# Altium PCB OFP_VIM_DC_v1.51.PcbDoc
Units mil, origin at the board's own origin, x right, y up, seen from the top; angles counter-clockwise.
Board outline 4311.02 x 2539.37 mil, 2 copper layers (Top Layer, Bottom Layer), stack 62.256 mil thick; 37 components, 28 nets, 102 pads, 117 vias.
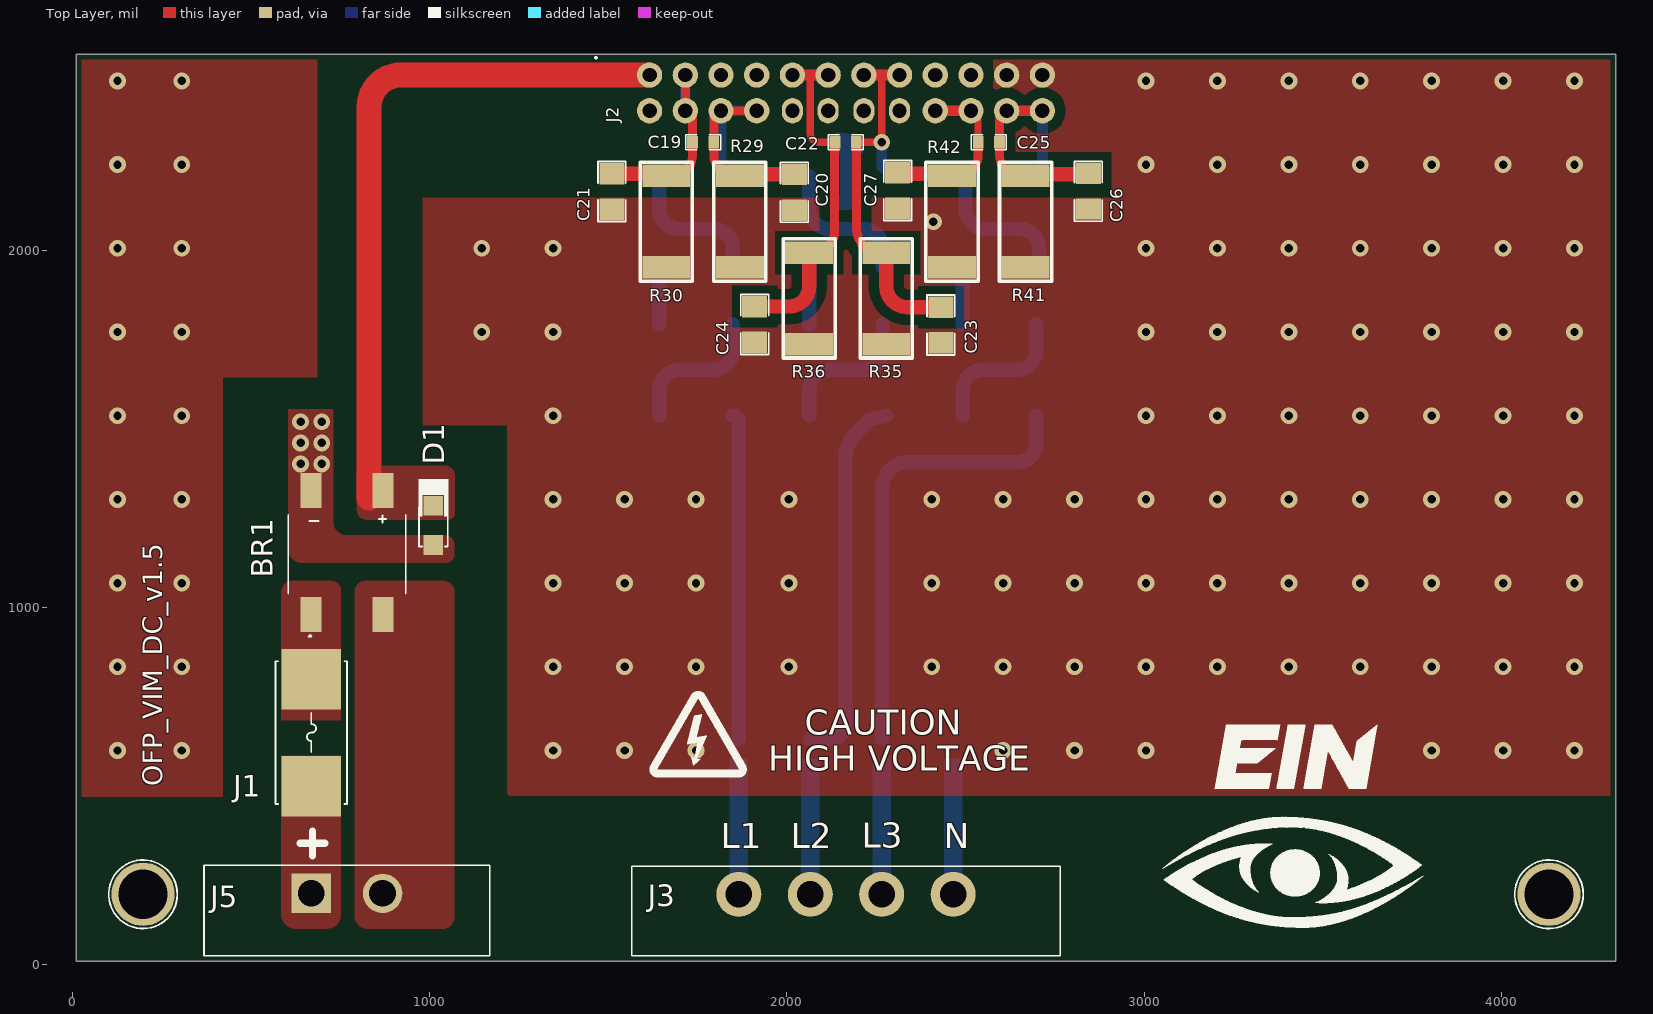
[diagram p0: Top Layer view]
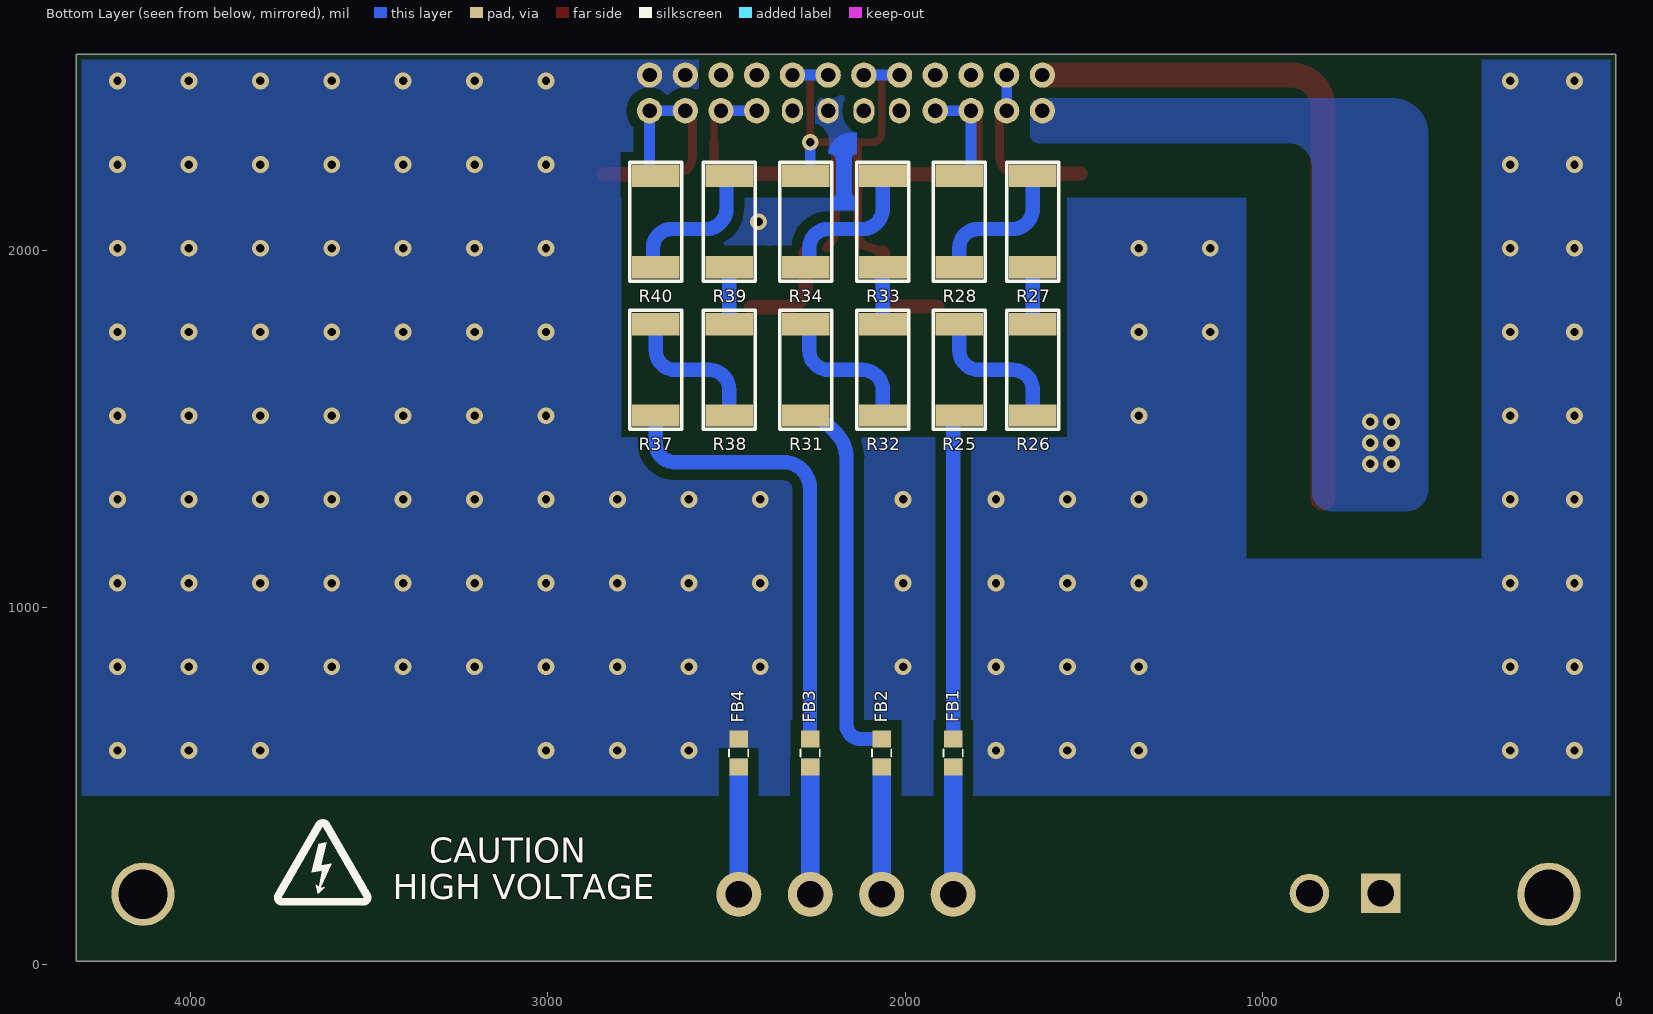
[diagram p1: Bottom Layer view, seen from below]
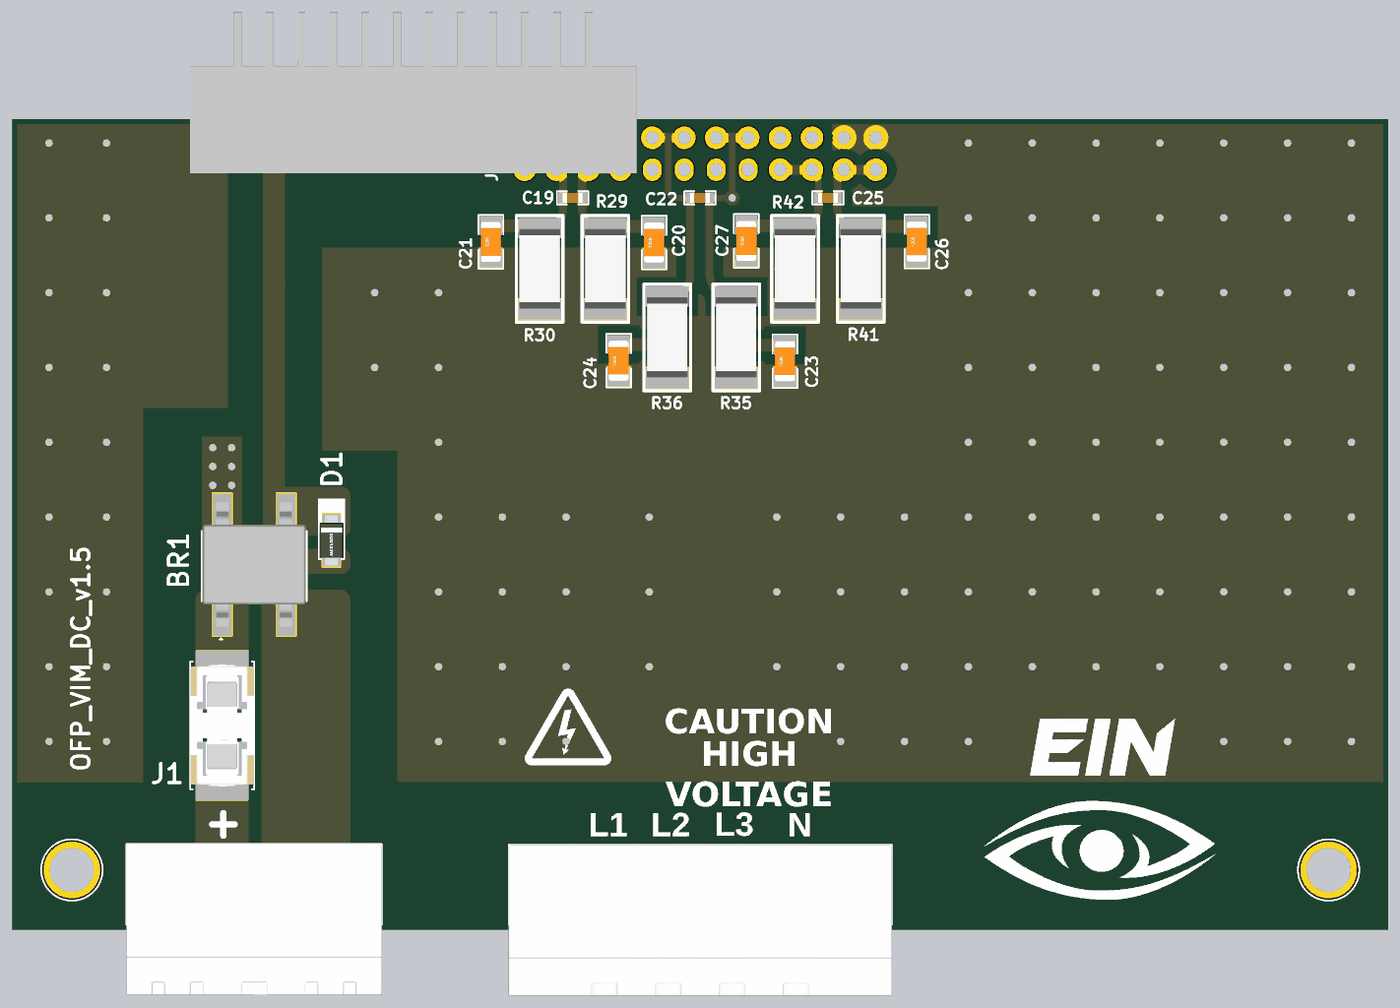
[diagram p2: 3D render of the assembled board from above, using the file's embedded part models]
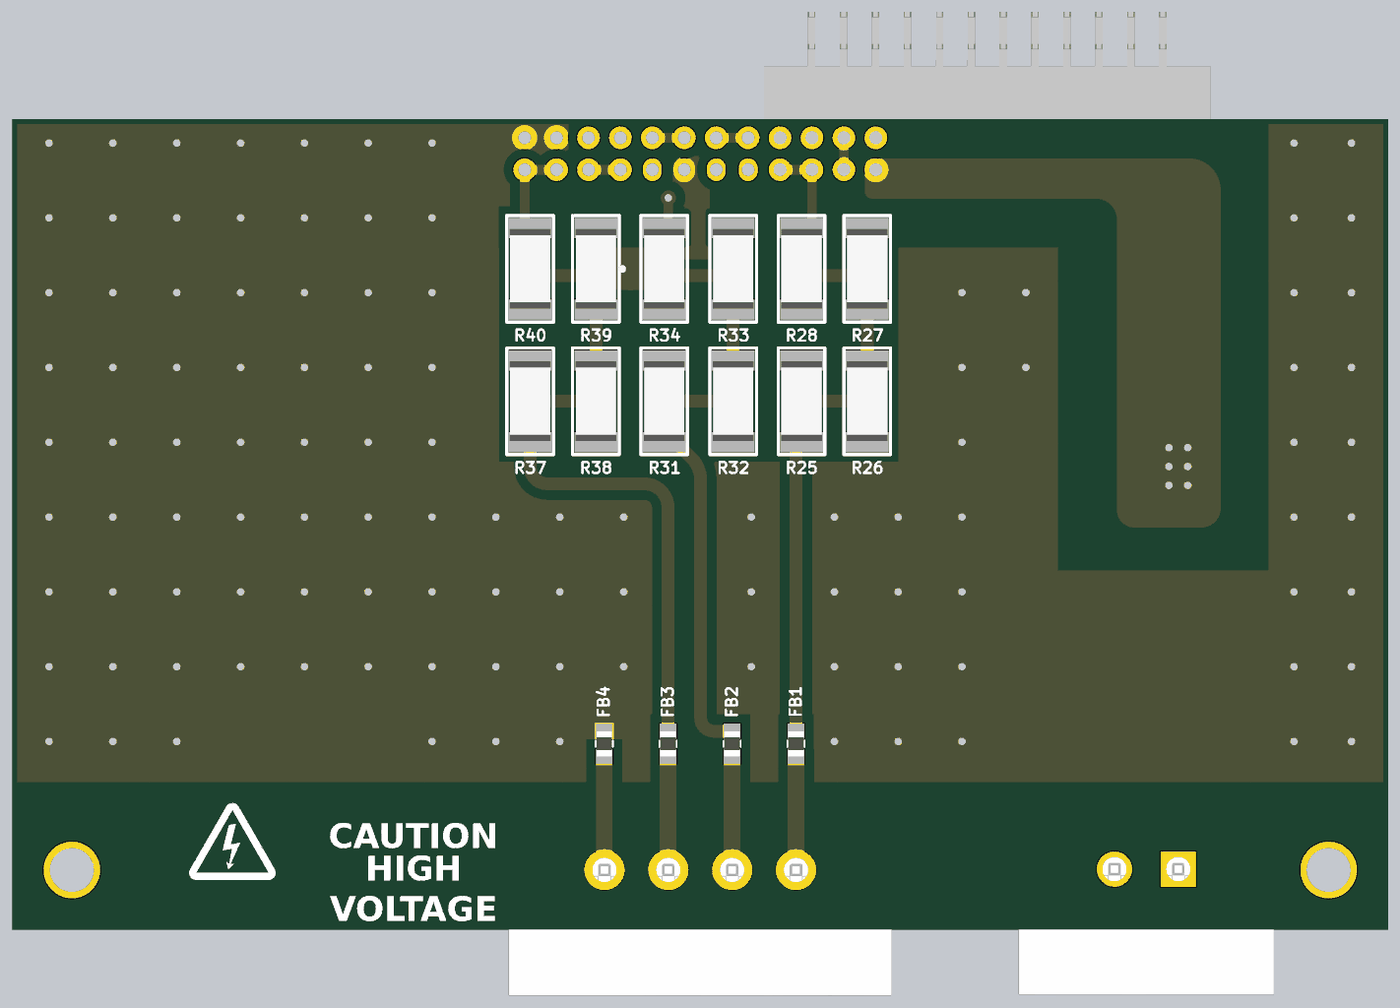
[diagram p3: 3D render of the assembled board from below, using the file's embedded part models]

## Layer stack, top to bottom
Top Solder: solder mask 0.4, Solder Resist, Dk 3.5
Top Layer: signal copper 1.378
Dielectric 1: dielectric 59.5, FR-4, Dk 4.8
Bottom Layer: signal copper 1.378
Bottom Solder: solder mask 0.4, Solder Resist, Dk 3.5

## Board outline
9.84,9.84 9.84,2549.21 4320.87,2549.21 4320.87,9.84

## Design rules (kind name [scope] priority, off if disabled: settings)
BoardOutlineClearance [All] p1: gap=0 ignorepadtopadclearanceinfootprint=FALSE except(15: Poly-OutlineEdge)
Clearance [All] p1: gap=10 ignorepadtopadclearanceinfootprint=FALSE except(7: SMDPad-SMDPad SMDPad-Fill; 20: Arc-Region Track-Region SMDPad-Region THPad-Region Via-Region Fill-Region Poly-Region Region-Region; 30: Arc-Poly Track-Poly SMDPad-Poly THPad-Poly Via-Poly Fill-Poly Poly-Poly)
ComponentClearance [All] p1: gap=0 collisioncheckmode=3 verticalgap=0 showdistances=FALSE
HoleSize [All] p1: absolutevalues=TRUE maxlimit=1000 minlimit=1 maxpercent=80.000 minpercent=20.000
HoleToHoleClearance [All] p1: gap=0 allowstackedmicrovias=TRUE
MinimumSolderMaskSliver [All] p1: minsoldermaskwidth=0
PolygonConnect [All] p1: connectstyle=Direct reliefconductorwidth=10 reliefentries=4 polygonreliefangle="90 Angle" airgapwidth=10
RoutingVias [All] p1: holewidth=11.81 width=23.62 viastyle="Through Hole" minholewidth=23.62 minwidth=47.24 maxholewidth=23.62 maxwidth=47.24
SilkToSilkClearance [All] p1: silktosilkclearance=0
SilkToSolderMaskClearance [IsPad] p1: minsilkscreentomaskgap=0 clearancetoexposedcopper=TRUE
SolderMaskExpansion [All] p1: expansion=4 istentingtop=FALSE
SupplyNets "Schematic Supply Nets" [InNet('PWR_GND')] p1: voltage=0.000
SupplyNets "Schematic Supply Nets_44" [InNet('VIN+')] p2: voltage=0.000
SupplyNets "Schematic Supply Nets_43" [InNet('GND')] p3: voltage=0.000
SupplyNets "Schematic Supply Nets_42" [InNet('12V')] p4: voltage=0.000
SupplyNets "Schematic Supply Nets_33" [InNet('VA_P')] p5: voltage=0.000
SupplyNets "Schematic Supply Nets_29" [InNet('VB_P')] p6: voltage=0.000
SupplyNets "Schematic Supply Nets_24" [InNet('VB_N')] p7: voltage=0.000
SupplyNets "Schematic Supply Nets_23" [InNet('VC_N')] p8: voltage=0.000
SupplyNets "Schematic Supply Nets_19" [InNet('VC_P')] p9: voltage=0.000
SupplyNets "Schematic Supply Nets_7" [InNet('VA_N')] p10: voltage=0.000
SupplyNets "Schematic Supply Nets_4" [InNet('NGND')] p11: voltage=0.000
Width [All] p1: maxlimit=100 minlimit=8 preferedwidth=15 minimp=50.000000 maximp=50.000000 favimp=50.000000
24 further rules are at their usual default settings.

## Components (designator, comment, footprint, x,y, rotation, side; value= is the part's Value field where it differs from the comment)
BR1 "DB307S" DBS 768.11,1153.62 r90 top
C19 "51pF" Cap-0603 1765.35,2302.65 r180 top
C20 "22nF" Cap-1206 2020.86,2162.88 r90 top
C21 "22nF" Cap-1206 1509.77,2164.78 r90 top
C22 "51pF" Cap-0603 2164.36,2302.64 r180 top
C23 "22nF" Cap-1206 2430.83,1790.85 r90 top
C24 "22nF" Cap-1206 1909.8,1792.69 r90 top
C25 "51pF" Cap-0603 2565.35,2302.65 r180 top
C26 "22nF" Cap-1206 2843.86,2165.83 r90 top
C27 "22nF" Cap-1206 2309.8,2167.7 r90 top
D1 "15V" SOD-123W 1010,1230 r90 top
FB1 "BLM21BD152SN1D" Ind-0805 1865.35,592.37 r90 bottom
FB2 "BLM21BD152SN1D" Ind-0805 2065.35,592.37 r90 bottom
FB3 "BLM21BD152SN1D" Ind-0805 2266,592.37 r90 bottom
FB4 "BLM21BD152SN1D" Ind-0805 2466,592.37 r90 bottom
J1 "01550900M" 01550900M 667.72,649.61 r90 top
J2 "SFH11-PBPC-D12-RA-BK" SFH11-PBPC-D12-RA-BK 2165.35,2440.95 r180 top locked
J3 "DB2ERM-5.08-4P-GN" DB2ERM-5.08-4P-GN 2165.35,196.85 r0 top locked
J5 "DB2ERM-5.08-2P-GN" DB2ERM-5.08-2P-GN 767.72,199.43 r0 top locked
R25 "200K" RES-2512 1848.16,1665.54 r90 bottom
R26 "200K" RES-2512 1642.16,1665.54 r90 bottom
R27 "200K" RES-2512 1642.16,2080.54 r90 bottom
R28 "200K" RES-2512 1848.16,2080.54 r90 bottom
R29 "1K" RES-2512 1868.16,2080.54 r90 top value=1kR
R30 "1K" RES-2512 1662.16,2080.54 r90 top value=1kR
R31 "200K" RES-2512 2278.16,1665.54 r90 bottom
R32 "200K" RES-2512 2062.16,1665.54 r90 bottom
R33 "200K" RES-2512 2062.16,2080.54 r90 bottom
R34 "200K" RES-2512 2278.16,2080.54 r90 bottom
R35 "1K" RES-2512 2278.16,1865.54 r90 top value=1kR
R36 "1K" RES-2512 2062.16,1865.53 r90 top value=1kR
R37 "200K" RES-2512 2698.16,1665.54 r90 bottom
R38 "200K" RES-2512 2492.16,1665.54 r90 bottom
R39 "200K" RES-2512 2492.16,2080.54 r90 bottom
R40 "200K" RES-2512 2698.16,2080.54 r90 bottom
R41 "1K" RES-2512 2668.16,2080.54 r90 top value=1kR
R42 "1K" RES-2512 2462.16,2080.55 r90 top value=1kR

## Footprints (in the part's own frame and the unit in brackets; to place one, negate y for a bottom-side part, rotate by r counter-clockwise, add the part's x,y. Pads: shape width x height; smd on the part's side, far side on the other; paste and mask are expansions set on the pad)
01550900M [mm]
  rect 4.3x4.24 smd paste+0 mask+0.051: 1(-3.8,0) 2(3.8,0)
  silkscreen extent -5.08,-2.54 5.08,2.54, body extent -4.86,-2.52 4.87,2.52, height 3.81
Cap-0603 [mil]
  rect 30x35 smd mask+2.36: 1(-30,0) 2(30,0)
  silkscreen extent -49,-21 49,21, body extent -32,-16 31,16, height 34
Cap-1206 [mil] "SMD 1206"
  rect 60x70 smd: 1(-50,0) 2(50,0)
  silkscreen extent -84,-39 84,39, body extent -63,-31 63,32, height 39
DB2ERM-5.08-2P-GN [mm]
  rect 2.8x2.8 hole 1.9: 1(-2.54,0)
  round 2.8 hole 1.9: 2(2.54,0)
  silkscreen extent -10.16,-4.43 10.16,2, body extent -10.16,-10 10.16,2, height 8.5
DB2ERM-5.08-4P-GN [mm]
  round 3.2 hole 1.9 paste-2539.97 mask+0.051: 1(-7.62,0) 2(-2.54,0) 3(2.54,0) 4(7.62,0)
  silkscreen extent -15.24,-4.37 15.24,2, body extent -15.24,-10 15.24,2, height 8.5
DBS [mm]
  rect 2.5x1.5 smd: 1(-4.41,2.55) 2(-4.41,-2.55) 3(4.41,-2.55) 4(4.41,2.55)
  silkscreen extent -5.97,-4.17 2.68,4.17, body extent -4.95,-4.11 4.95,4.11, height 3.41
Ind-0805 [mm] "Inductor 0805"
  rect 1.2x1.32 smd: 1(-1,0) 2(1,0)
  silkscreen extent -0.25,-0.69 0.25,0.69, body extent -1,-0.62 1,0.63, height 0.47
RES-2512 [mm]
  rect 1.6x3.4 smd: 1(-3.25,0) 2(3.25,0)
  silkscreen extent -4.24,-1.85 4.24,1.85, body extent -3.17,-1.63 3.18,1.63, height 0.58
SFH11-PBPC-D12-RA-BK [mm]
  round 1.8 hole 1.02: 1(-13.97,-1.27) 2(-13.97,1.27) 3(-11.43,-1.27) 4(-11.43,1.27) 5(-8.89,-1.27) 6(-8.89,1.27) 7(-6.35,-1.27) 8(-6.35,1.27) 9(-3.81,-1.27) 11(-1.27,-1.27) 13(1.27,-1.27) 15(3.81,-1.27) 17(6.35,-1.27) 18(6.35,1.27) 19(8.89,-1.27) 20(8.89,1.27) 21(11.43,-1.27) 22(11.43,1.27) 23(13.97,-1.27) 24(13.97,1.27)
  oval 1.5x1.8 hole 1.02: 10(-3.81,1.27) 12(-1.27,1.27) 14(1.27,1.27) 16(3.81,1.27)
  silkscreen extent 17.78,-2.51 17.79,-2.5, body extent -17.78,-11.29 17.78,1.55, height 7.05
SOD-123W [mm] "DIODE SCHOTTKY 30V 1A SOD123W"
  rect 1.4x1.4 smd: 1(-1.4,0) 2(1.4,0)
  silkscreen extent -1.5,-1.07 3.3,1.07, body extent -2,-0.95 2,0.95, height 1.1

## Part data
BR1: "60A 1.1V@3A 3A 1kV DBS Bridge Rectifiers ROHS", LCSC Part Number=C525744, Manufacturer=GOODWORK, Package=DBS, ComponentLink1Description=LCSC, ComponentLink1URL=https://lcsc.com/product-detail/Bridge-Rectifiers_GOODWORK-DB307S_C525744.html?s_z=n_LMB8S-TP, Item Type="Bridge Rectifiers", Manufacturer Part Number=DB307S
C19 C22 C25: library part GQM1875C2E510FB12D, "51 pF ±1% 250V Ceramic Capacitor C0G, NP0 0603 (1608 Metric)", LCSC Part Number=C17504198, Manufacturer=Murata, Item Type=Capacitors, Manufacturer Part Number=GQM1875C2E510FB12D, Pricing="1=0.58, 10=0.26, 50=0.26, 100=0.181, 1000=0.16, 10000=0.122 (USD)", RoHS=Yes, Stock=1634, Supplier=Mouser
C20 C21 C23 C24 C26 C27: library part CC1206KKX7RBBB223, "CAP CER 0.022UF 500V X7R 1206", LCSC Part Number=C326702, Manufacturer=Yageo, ComponentLink1Description=http://www.mouser.com/ds/2/447/Yageo_UPY-GP_NP0_16V-to-50V_9-358835.pdf?src-supplier=Mouser, ComponentLink1URL=http://www.mouser.com/ds/2/447/Yageo_UPY-GP_NP0_16V-to-50V_9-358835.pdf?src-supplier=Mouser, ComponentLink2Description=http://www.yageo.com/documents/recent/UPY-NP0X7R_MV_100-to-630V_9.pdf?src-supplier=Avnet, ComponentLink2URL=http://www.yageo.com/documents/recent/UPY-NP0X7R_MV_100-to-630V_9.pdf?src-supplier=Avnet, ComponentLink3Description=http://www.yageo.com/documents/recent/UPY-NP0X7R_MV_100-to-630V_19.pdf?src-supplier=Digikey, ComponentLink3URL=http://www.yageo.com/documents/recent/UPY-NP0X7R_MV_100-to-630V_19.pdf?src-supplier=Digikey, ComponentLink4Description=http://www.yageo.com/documents/recent/UPY-NP0X7R_MV_100-to-630V_21.pdf?src-supplier=Digikey, ComponentLink4URL=http://www.yageo.com/documents/recent/UPY-NP0X7R_MV_100-to-630V_21.pdf?src-supplier=Digikey, ComponentLink5Description=https://www.yageo.com/upload/media/product/products/datasheet/mlcc/UPY-NP0X7R_MV_100-to-630V_21.pdf?src-supplier=Digikey, ComponentLink5URL=https://www.yageo.com/upload/media/product/products/datasheet/mlcc/UPY-NP0X7R_MV_100-to-630V_21.pdf?src-supplier=Digikey, ComponentLink6Description=http://www.yageo.com/documents/recent/UPY-NP0X7R_MV_100-to-630V_9.pdf?src-supplier=Future+Electronics, ComponentLink6URL=http://www.yageo.com/documents/recent/UPY-NP0X7R_MV_100-to-630V_9.pdf?src-supplier=Future+Electronics, ComponentLink7Description=https://datasheet.octopart.com/CC1206KKX7RBBB223-Yageo-datasheet-10979222.pdf?src-supplier=Future+Electronics, ComponentLink7URL=https://datasheet.octopart.com/CC1206KKX7RBBB223-Yageo-datasheet-10979222.pdf?src-supplier=Future+Electronics, Item Type=Capacitors, Lead Free=5697LeadFree, Manufacturer Part Number=CC1206KKX7RBBB223, Pricing="3000=0.0421, 6000=0.0414, 12000=0.0407, 15000=0.0405, 45000=0.0392 (USD)", RoHS=Yes, Stock=660000, Supplier="Future Electronics"
D1: library part MMSZ5245B-7-F, "DIODE ZENER 15V 500MW SOD123", LCSC Part Number=C177050, Manufacturer=Diodes, Reverse Voltage=11V, ComponentLink1Description=https://datasheet.ciiva.com/15142/getdatasheetpartid-110401-15142750.pdf?src-supplier=Verical, ComponentLink1URL=https://datasheet.ciiva.com/15142/getdatasheetpartid-110401-15142750.pdf?src-supplier=Verical, ComponentLink2Description=https://datasheet.ciiva.com/890/ds18010-890775.pdf?src-supplier=Digikey, ComponentLink2URL=https://datasheet.ciiva.com/890/ds18010-890775.pdf?src-supplier=Digikey, ComponentLink3Description=https://datasheet.ciiva.com/890/ds18010-890776.pdf?src-supplier=Digikey, ComponentLink3URL=https://datasheet.ciiva.com/890/ds18010-890776.pdf?src-supplier=Digikey, ComponentLink4Description=https://datasheet.ciiva.com/890/ds18010-890777.pdf?src-supplier=Digikey, ComponentLink4URL=https://datasheet.ciiva.com/890/ds18010-890777.pdf?src-supplier=Digikey, ComponentLink5Description=https://datasheet.ciiva.com/8025/ds18010-8025783.pdf?src-supplier=Element14, ComponentLink5URL=https://datasheet.ciiva.com/8025/ds18010-8025783.pdf?src-supplier=Element14, Item Type=Diodes, Manufacturer Part Number=MMSZ5245B-7-F, Pricing="6000=0.0138 (USD)", RoHS=Yes, Stock=414000, Supplier="Arrow Electronics"
FB1 FB2 FB3 FB4: "FERRITE BEAD 1.5 KOHM 0805 1LN", Frequency=100MHz, LCSC Part Number=C413959, Manufacturer=Murata, RMS Current (Irms)=250mA, ComponentLink1Description=https://datasheet.ciiva.com/19454/1845267-19454720.pdf?src-supplier=Jameco, ComponentLink1URL=https://datasheet.ciiva.com/19454/1845267-19454720.pdf?src-supplier=Jameco, ComponentLink2Description=https://datasheet.ciiva.com/14122/amblm21b-data-e-14122891.pdf?src-supplier=Distrelec, ComponentLink2URL=https://datasheet.ciiva.com/14122/amblm21b-data-e-14122891.pdf?src-supplier=Distrelec, ComponentLink3Description=https://datasheet.ciiva.com/6211/l0110s0100blm21b-6211484.pdf?src-supplier=Digikey, ComponentLink3URL=https://datasheet.ciiva.com/6211/l0110s0100blm21b-6211484.pdf?src-supplier=Digikey, ComponentLink4Description=https://datasheet.ciiva.com/6211/l0110s0100blm21b-6211486.pdf?src-supplier=Digikey, ComponentLink4URL=https://datasheet.ciiva.com/6211/l0110s0100blm21b-6211486.pdf?src-supplier=Digikey, ComponentLink5Description=https://datasheet.ciiva.com/6211/l0110s0100blm21b-6211487.pdf?src-supplier=Digikey, ComponentLink5URL=https://datasheet.ciiva.com/6211/l0110s0100blm21b-6211487.pdf?src-supplier=Digikey, ComponentLink6Description=https://datasheet.ciiva.com/16420/l0110s0100blm21b-16420715.pdf?src-supplier=Future+Electronics, ComponentLink6URL=https://datasheet.ciiva.com/16420/l0110s0100blm21b-16420715.pdf?src-supplier=Future+Electronics, ComponentLink7Description=https://datasheet.ciiva.com/17277/l0110s0100blm21b-17277370.pdf?, ComponentLink7URL=https://datasheet.ciiva.com/17277/l0110s0100blm21b-17277370.pdf?, ESR=450mR, Item Type="Ferrite Beads", Lead Free=5697LeadFree, Manufacturer Part Number=BLM21BD152SN1D, Number of Circuits=1NUMBER, Pricing="1=0.21, 10=0.114, 50=0.114, 100=0.102, 1000=0.068, 10000=0.048 (USD)", RoHS=Yes, Shielding=202Shielding, Stock=31999, Supplier=Mouser
J1: "FUSE BLOK CARTRIDGE 125V 10A SMD", LCSC Part Number=C108518, Manufacturer=Littelfuse, ComponentLink1Description=https://datasheet.ciiva.com/3812/01550900m-3812998.pdf?src-supplier=Arrow+Electronics, ComponentLink1URL=https://datasheet.ciiva.com/3812/01550900m-3812998.pdf?src-supplier=Arrow+Electronics, Item Type="Fuse Holders", Lead Free=5697LeadFree, Manufacturer Part Number=01550900M, Pricing="1=2.5, 5=2.072, 10=1.912, 50=1.586, 100=1.4631, 250=1.31448, 500=1.21164, 1000=1.11633, 5000=1.06138 (USD)", Reach SVHC Compliant=4187SVHC, RoHS=Yes, Stock=4038, Supplier=Digikey
J2: "CONN HDR 24POS 0.1 GOLD PCB R/A", Color=Black, Manufacturer=Sullins, Package Quantity=1000, ComponentLink1Description=http://sullinscorp.com/catalogs/147_PAGE119_.100_SFH11_SERIES_FEMALE_HDR_ST_RA.pdf?src-supplier=Digikey, ComponentLink1URL=http://sullinscorp.com/catalogs/147_PAGE119_.100_SFH11_SERIES_FEMALE_HDR_ST_RA.pdf?src-supplier=Digikey, Connector Type=Header, Contact Plating=Gold, Contact Type="Female Socket", Item Type=Connectors, Manufacturer Part Number=SFH11-PBPC-D12-RA-BK, Mounting Technology="Through Hole", Number of Positions=24, Number of Rows=2, Packaging=Tray, Pitch=0.1inch, Pricing="1000=0.8853 (USD)", RoHS=Yes, RoHS Compliant=Yes, Row Spacing=0.1inch, Series=SFH11, Supplier=Digikey, Termination=Solder
J3: "320V 20A 4 Bend -40℃~+105℃ 1 5.08mm 1x4P Green Receptacle-Close Screw Fixing Push-Pull,P=5.08mm Pluggable System Terminal Block ROHS", LCSC Part Number=C395755, Manufacturer=DORABO, Package=Push-Pull,P=5.08mm, ComponentLink1Description=LCSC, ComponentLink1URL=https://www.lcsc.com/product-detail/Pluggable-System-Terminal-Block_DORABO-DB2ERM-5-08-4P-GN_C395755.html?s_z=n_DB2ERM-5.08-4P-GN, Item Type="Terminal Block", Manufacturer Part Number=DB2ERM-5.08-4P-GN
J5: "320V 20A 2 Right-Angle Pin -40℃~+105℃ 1 5.08mm 1x2P Green Board Side/Socket - Closed Screw Push-Pull,P=5.08mm Pluggable System Terminal Block ROHS", LCSC Part Number=C395735, Manufacturer=DORABO, Package=Push-Pull,P=5.08mm, ComponentLink1Description=LCSC, ComponentLink1URL=https://lcsc.com/product-detail/Pluggable-System-Terminal-Block_DORABO-DB2ERM-5-08-2P-GN_C395735.html?s_z=n_DB2ERM-5.08-2P-GN, Item Type="Terminal Block", Manufacturer Part Number=DB2ERM-5.08-2P-GN
R25 R26 R27 R28 R31 R32 R33 R34 R37 R38 R39 R40: library part CRCW2512200KFKEG, "RES SMD 200K OHM 1% 1W 2512", LCSC Part Number=C2078538, Manufacturer="Vishay Dale", Voltage Rating (DC)=500V, ComponentLink1Description=https://datasheet.ciiva.com/16435/dcrcwe3-16435690.pdf?src-supplier=Future+Electronics, ComponentLink1URL=https://datasheet.ciiva.com/16435/dcrcwe3-16435690.pdf?src-supplier=Future+Electronics, ComponentLink2Description=https://datasheet.ciiva.com/5545/dcrcwe3-109170-5545692.pdf?src-supplier=Mouser, ComponentLink2URL=https://datasheet.ciiva.com/5545/dcrcwe3-109170-5545692.pdf?src-supplier=Mouser, Item Type=Resistors, Lead Free=5697LeadFree, Manufacturer Part Number=CRCW2512200KFKEG, Pricing="1=0.3, 10=0.127, 50=0.127, 100=0.082, 1000=0.067, 10000=0.047 (USD)", RoHS=Yes, Stock=29311, Supplier=Mouser
R29 R30 R35 R36 R41 R42: library part RC2512JK-071KL, "RES 1K OHM 5% 1W 2512", Case Code (Imperial)=2512, Case Code (Metric)=6432, LCSC Part Number=C137010, Manufacturer=Yageo, Max Operating Temperature=155°C, Max Power Dissipation=1W, Min Operating Temperature=-55°C, Resistance Tolerance=5%, Resistor Type="Thick Film", Supplier Part Number=9067984, Temperature Coefficient=100ppm/°C, Voltage Rating=200V, Case/Package=2512, Category="Chip SMD Resistors", ComponentLink1Description=https://datasheet.ciiva.com/5595/pyu-rc2512-51-rohs-l-4-5595927.pdf?src-supplier=Mouser, ComponentLink1URL=https://datasheet.ciiva.com/5595/pyu-rc2512-51-rohs-l-4-5595927.pdf?src-supplier=Mouser, ComponentLink2Description=https://datasheet.ciiva.com/7672/638316-7672039.pdf?src-supplier=Element14, ComponentLink2URL=https://datasheet.ciiva.com/7672/638316-7672039.pdf?src-supplier=Element14, ComponentLink3Description=https://datasheet.ciiva.com/7672/638316-7672038.pdf?src-supplier=Element14, ComponentLink3URL=https://datasheet.ciiva.com/7672/638316-7672038.pdf?src-supplier=Element14, Contact Plating=Tin,Lead, Features="Moisture Resistant", Height=0.026inch, Item Type=Resistor, Lead Free=5697LeadFree, Length=0.25inch, Manufacturer Part Number=RC2512JK-071KL, Number of Terminations=2, Packaging="Tape and Reel", Power Rating=1W, Pricing="4000=0.0216, 16000=0.0207, 40000=0.0201, 100000=0.0195, 160000=0.0187 (USD)", Reach SVHC Compliant=Unknown, RoHS=Yes, RoHS Compliant=Yes, Series=RC, Stock=596000, Supplier="Future Electronics", Technology="THICK FILM", Termination=SMD/SMT, Tolerance=5%, Width=3.1mm, Working Voltage=200V

## Free pads (board coordinates)
  round 177.17 hole 137.8: MH2(196.85,196.85) MH2(4133.86,196.85)

## Via types
v1: diameter 47.24, hole 23.62, Top Layer to Bottom Layer, tented both sides, 117 vias

## Nets (pads, with @x,y where several pads share a name; then routed paths per layer and width w, separated by ;. In a path a pad name is that pad's centre, name@x,y a point inside that pad or via, vN(x,y) a via of type N, cw(c..) or ccw(c..) an arc to the next point about the centre after c; other vN are vias at no path point)
12V: J1.1 J5.1
GND: BR1.4 D1.1 J2.24
  other v1: 638.19,1401.89 697.24,1401.89 638.19,1460.94 697.24,1460.94 638.19,1520 697.24,1520
NetBR1_1: BR1.1 J1.2
NetFB1_2: FB1.2 R25.1 | length 916.3
  Bottom Layer w40: R25.1 1853.86,1537.59 1865.35,1526.09 FB1.2
NetFB2_2: FB2.2 R31.1 | length 1047.7
  Bottom Layer w40: FB2.2 2123.43,631.74 ccw(c2123.43,672.31) 2164,672.31 2164,1418.42 2164,1418.53 cw(c2262.81,1418.53) 2193.49,1488.94 2231.23,1526.09 R31.1
NetFB3_2: FB3.2 R37.1 | length 1283.4
  Bottom Layer w40: FB3.2 2266,1332 cw(c2341,1332) 2341,1407 2646,1407 ccw(c2646,1459.16) 2698.16,1459.16 R37.1
NetR25_2: R25.2 R26.1 | length 414.3
  Bottom Layer w40: R26.1 1642.16,1608.88 cw(c1698.81,1608.88) 1698.81,1665.54 1793.79,1665.54 ccw(c1793.79,1719.91) 1848.16,1719.91 R25.2
NetR26_2: R26.2 R27.1 | length 159.1
  Bottom Layer w40: R26.2 R27.1
NetR27_2: R27.2 R28.1 | length 414.3
  Bottom Layer w40: R27.2 1642.16,2117.85 ccw(c1700.48,2117.85) 1700.48,2059.53 1795.45,2059.53 cw(c1795.45,2006.82) 1848.16,2006.82 R28.1
NetR31_2: R31.2 R32.1 | length 414.3
  Bottom Layer w40: R32.1 2062.16,1608.88 cw(c2118.81,1608.88) 2118.81,1665.54 2213.79,1665.54 ccw(c2213.79,1719.91) 2268.16,1719.91 R31.2@2268.16,1793.49
NetR32_2: R32.2 R33.1 | length 159.1
  Bottom Layer w40: R32.2 R33.1
NetR33_2: R33.2 R34.1 | length 414.3
  Bottom Layer w40: R33.2 2062.16,2117.85 ccw(c2120.48,2117.85) 2120.48,2059.53 2215.45,2059.53 cw(c2215.45,2006.82) 2268.16,2006.82 R34.1@2268.16,1952.59
NetR37_2: R37.2 R38.1 | length 414.3
  Bottom Layer w40: R38.1 2492.16,1608.89 cw(c2548.81,1608.89) 2548.81,1665.54 2643.79,1665.54 ccw(c2643.79,1719.91) 2698.16,1719.91 R37.2
NetR38_2: R38.2 R39.1 | length 159.1
  Bottom Layer w40: R38.2 R39.1
NetR39_2: R39.2 R40.1 | length 414.3
  Bottom Layer w40: R39.2@2500,2208.49 2500,2117.85 ccw(c2558.32,2117.85) 2558.32,2059.53 2653.29,2059.53 cw(c2653.29,2006.82) 2706,2006.82 R40.1@2706,1952.59
NEUTRAL: FB4.1 J3.4
NGND: C20.1 C21.1 C23.1 C24.1 C26.1 C27.1 FB4.2 J2.1 J2.3 J2.12 R29.1 R30.1 R35.1 R36.1 R41.1 R42.1
  other v1: 125.35,599.53 305.35,599.53 1345.35,599.53 1545.35,599.53 1745.35,599.53 2605.35,599.53 2805.35,599.53 3005.35,599.53 3805.35,599.53 4005.35,599.53 4205.35,599.53 125.35,833.9 305.35,833.9 1345.35,833.9 1545.35,833.9 1745.35,833.9 2005.35,833.9 2405.35,833.9 2605.35,833.9 2805.35,833.9 3005.35,833.9 3205.35,833.9 3405.35,833.9 3605.35,833.9 3805.35,833.9 4005.35,833.9 4205.35,833.9 125.35,1068.28 305.35,1068.28 1345.35,1068.28 1545.35,1068.28 1745.35,1068.28 2005.35,1068.28 2405.35,1068.28 2605.35,1068.28 2805.35,1068.28 3005.35,1068.28 3205.35,1068.28 3405.35,1068.28 3605.35,1068.28 3805.35,1068.28 4005.35,1068.28 4205.35,1068.28 125.35,1302.65 305.35,1302.65 1345.35,1302.65 1545.35,1302.65 1745.35,1302.65 2005.35,1302.65 2405.35,1302.65 2605.35,1302.65 2805.35,1302.65 3005.35,1302.65 3205.35,1302.65 3405.35,1302.65 3605.35,1302.65 3805.35,1302.65 4005.35,1302.65 4205.35,1302.65 125.35,1537.03 305.35,1537.03 1345.35,1537.03 3005.35,1537.03 3205.35,1537.03 3405.35,1537.03 3605.35,1537.03 3805.35,1537.03 4005.35,1537.03 4205.35,1537.03 125.35,1771.4 305.35,1771.4 1145.35,1771.4 1345.35,1771.4 3005.35,1771.4 3205.35,1771.4 3405.35,1771.4 3605.35,1771.4 3805.35,1771.4 4005.35,1771.4 4205.35,1771.4 125.35,2005.78 305.35,2005.78 1145.35,2005.78 1345.35,2005.78 3005.35,2005.78 3205.35,2005.78 3405.35,2005.78 3605.35,2005.78 3805.35,2005.78 4005.35,2005.78 4205.35,2005.78 2410,2080.03 125.35,2240.15 305.35,2240.15 3005.35,2240.15 3205.35,2240.15 3405.35,2240.15 3605.35,2240.15 3805.35,2240.15 4005.35,2240.15 4205.35,2240.15 125.35,2474.53 305.35,2474.53 3005.35,2474.53 3205.35,2474.53 3405.35,2474.53 3605.35,2474.53 3805.35,2474.53 4005.35,2474.53 4205.35,2474.53
PWR_GND: BR1.2 J5.2
VA_INPUT: FB1.1 J3.1
VA_N: C19.2 C21.2 J2.21 J2.22 R30.2 | length 571.6
  Top Layer w25: R30.2 1719.09,2225.8 ccw(c1678.05,2265.8) 1735.35,2265.8 C19.2 J2.22@1735.35,2387.56 ; J2.22 J2.21
  Top Layer w40: C21.2 R30.2@1655.87,2214.78
  Bottom Layer w30: J2.22 J2.21
VA_P: C19.1 C20.2 J2.18 J2.20 R28.2 R29.2 | length 768.2
  Top Layer w25: J2.20@1795.35,2385.04 1795.35,2265.8 ccw(c1852.66,2265.8) 1811.62,2225.8 1868.19,2208.6 R29.2@1868.55,2208.49 ; J2.20 J2.18
  Top Layer w40: R29.2@1874.76,2212.88 C20.2
  Bottom Layer w30: R28.2 1815.35,2232.49 J2.20 J2.18
VB_INPUT: FB2.1 J3.2
VB_N: C22.2 C24.2 J2.13 J2.15 R36.2 | length 1074.8
  Top Layer w20: 2065.35,2490.95 2065.35,2327.58 ccw(c2090.3,2327.58) 2090.3,2302.64 2133.65,2302.64 C22.2
  Top Layer w25: R36.2@2061.19,1996.69 2117.39,2013.77 ccw(c2076.35,2053.77) 2133.65,2053.77 C22.2@2133.65,2302.64
  Top Layer w30: J2.15 2065.35,2490.95 J2.13
  Top Layer w40: C24.2 2005.78,1842.69 ; 2008.39,1842.75 ccw(c2005.78,1899.07) 2062.16,1899.07 R36.2
  Bottom Layer w30: J2.15 J2.13
VB_P: C22.1 C23.2 J2.9 J2.11 R34.2 R35.2 | length 1139.2
  Top Layer w20: C22.1 2263.65,2302.64 2264.13,2302.67 cw(c2265.35,2282.71) 2265.35,2302.71 2265.35,2490.95
  Top Layer w25: C22.1 2194.36,2066.84 2194.36,2066.77 ccw(c2280.82,2066.77) R35.2@2218.9,2006.42
  Top Layer w30: J2.11 2265.35,2490.95 J2.9
  Top Layer w40: R35.2 2278.16,1900 ccw(c2337.31,1900) 2337.31,1840.85 C23.2
  Bottom Layer w15: R34.2@2265.35,2232.49 R34.2
  Bottom Layer w30: J2.11 J2.9 ; R34.2@2265.35,2232.49 v1(2265.35,2302.64)
VC_INPUT: FB3.1 J3.3
VC_N: C25.2 C27.2 J2.6 J2.8 R42.2 | length 586.4
  Top Layer w20: J2.6 cw(c2515.35,2370.95) 2535.35,2370.95 C25.2
  Top Layer w25: R42.2 2519.09,2225.8 ccw(c2478.05,2265.8) 2535.35,2265.8 C25.2
  Top Layer w30: J2.8 J2.6
  Top Layer w40: C27.2@2309.77,2214.78 R42.2@2455.87,2214.78
  Bottom Layer w30: J2.8 J2.6
VC_P: C25.1 C26.2 J2.2 J2.4 R40.2 R41.2 | length 908.3
  Top Layer w20: C25.1 2595.35,2370.95 cw(c2615.35,2370.95) J2.4
  Top Layer w25: J2.4 ccw(c2615.35,2370.95) 2595.35,2370.95 2595.35,2265.8 ccw(c2652.66,2265.8) 2611.62,2225.8 2668.19,2208.6 R41.2@2668.55,2208.49
  Top Layer w30: J2.4 J2.2
  Top Layer w40: R41.2@2674.76,2212.88 C26.2@2843.86,2212.88
  Bottom Layer w30: J2.4@2620,2390.95 J2.2 ; R40.2@2682.55,2208.49 2692.72,2215.93 2715.35,2232.49 J2.2 ; J2.2@2720,2390.95 J2.2
VIN+: BR1.3 D1.2 J2.23 | length 1931
  Top Layer w70: 830,1307.24 830,2402.39 cw(c918.56,2402.39) 918.56,2490.95 J2.23
pads on no net: J2.5 J2.7 J2.10 J2.14 J2.16 J2.17 J2.19

## Polygon pours and split planes (outlines as drawn)
NGND on Bottom Layer "NONET_L-01_P-001" (solid, remove dead copper, pour order 59): 1044.99,1298.95 1044.99,1136.02 385,1136.02 385,2549.21 9.84,2549.21 9.84,472.19 4320.87,472.19 4320.87,2549.21 2578.27,2549.21 2578.27,2275.83 2908.86,2275.83 2908.86,2146.92 1045.03,2146.92
GND on Bottom Layer "NONET_L-01_P-001" (solid, pour order 65): 635,2426.38 ccw(c635,2326.38) 535,2326.38 535,1330 ccw(c595,1330) 595,1270 732.56,1270 805,1270 ccw(c805,1325) 860,1325 860,2235 cw(c925,2235) 925,2300 1625,2300 ccw(c1625,2324.92) 1649.92,2324.92 1649.92,2397.39 ccw(c1620.93,2397.39) 1620.93,2426.38
NGND on Bottom Layer "NGND_L02_P051" (solid, pour order 51): 2250.79,2173.86 ccw(c2276.94,2173.86) 2276.94,2147.7 2418.13,2147.7 cw(c2418.13,2116.03) 2449.81,2116.03 2449.81,2044.73 cw(c2419.16,2044.73) 2419.16,2014.09 2179.1,2014.09 cw(c2179.85,2058.78) 2135.16,2059.53 2135.16,2403.16 cw(c2166,2403.16) 2166,2434 2213.64,2434 cw(c2213.64,2396.85) 2250.79,2396.85
NGND on Bottom Layer "NGND_L02_P050" (solid, pour order 50): 2601.25,2531.46 ccw(c2601.25,2510.14) 2579.92,2510.14 2579.92,2476.58 ccw(c2605.08,2476.58) 2605.08,2451.42 2778.58,2451.42 cw(c2778.58,2432.85) 2797.16,2432.84 2797.16,1793.49 2950,1793.49 2950,2531.46
NGND on Top Layer "NONET_L-01_P-001" (solid, pour order 67): 9.84,2549.21 685,2549.21 685,1645 420,1645 420,470 9.84,470
NGND on Top Layer "NONET_L-01_P-001" (solid, pour order 66): 980,2146.92 980,1510.7 1216.53,1510.7 1216.49,472.19 4320.87,472.19 4320.87,2549.21 2578.27,2549.21 2578.27,2275.83 2908.86,2275.83 2908.86,2146.92
GND on Top Layer "NONET_L-01_P-001" (solid, pour order 64): 1041.46,1202.44 cw(c1041.46,1174.88) 1069.02,1174.88 1069.02,1150.3 cw(c1043.72,1150.3) 1043.72,1125 641.37,1125 cw(c641.37,1162.63) 603.74,1162.63 603.74,1555 730,1555 730,1240 ccw(c767.56,1240) 767.56,1202.44
VIN+ on Top Layer "NONET_L-01_P-001" (solid, pour order 63): 795,1312.5 795,1371.46 cw(c821.04,1371.46) 821.04,1397.5 1040.78,1397.5 cw(c1040.78,1368.28) 1070,1368.28 1070,1265.5 cw(c1050,1265.5) 1050,1245.5 824.5,1245.5 cw(c824.5,1275) 795,1275
NetBR1_1 on Top Layer "NONET_L-01_P-001" (solid, pour order 62): 584.25,684.72 584.25,1043.51 cw(c615.74,1043.51) 615.74,1075 722.72,1075 cw(c722.72,1046.54) 751.18,1046.54 751.18,684.72
12V on Top Layer "NONET_L-01_P-001" (solid, pour order 61): 751.18,584.65 751.18,141.18 cw(c710,141.18) 710,100 625,100 cw(c625,140.75) 584.25,140.75 584.25,584.65
PWR_GND on Top Layer "NONET_L-01_P-001" (solid, pour order 60): 1036.05,1075 cw(c1036.05,1042.03) 1069.02,1042.03 1069.02,134.02 cw(c1035,134.02) 1035,100 824.66,100 cw(c824.66,134.66) 790,134.66 790,1045 cw(c820,1045) 820,1075
NGND on Top Layer "NGND_L01_P049" (solid, pour order 49): 1479.15,2146.6 ccw(c1479.15,2114.78) 1447.32,2114.78 1447.33,1758.08 ccw(c1499.31,1758.08) 1499.31,1706.09 2329.09,1706.09 2329.09,1769.08 ccw(c2327.34,1769.09) 2327.32,1770.84 2268.34,1770.05 cw(c2278.15,1819.23) 2263.59,1771.24 cw(c2263.59,1806.87) 2227.97,1806.87 2227.97,1898.23 ccw(c2202.23,1898.23) 2202.22,1923.97 2145,1923.97 ccw(c2144.98,1895.72) 2116.73,1895.73 2116.73,1807.43 cw(c2081.99,1807.43) 2081.99,1772.69 1828.21,1772.69 cw(c1828.21,1796.17) 1804.73,1796.18 1804.73,1880.41 cw(c1827.32,1880.41) 1827.33,1903 1915.28,1903 ccw(c1915.29,1922.88) 1935.16,1922.89 1935.16,2034.39 cw(c1955.76,2034.39) 1955.77,2054.99 2056.17,2054.99 ccw(c2056.17,2086.62) 2087.81,2086.63 2087.81,2116.62 ccw(c2057.82,2116.62) 2057.82,2146.6
NGND on Top Layer "NGND_L01_P048" (solid, pour order 48): 2861.9,2147 cw(c2861.9,2118.9) 2890,2118.9 2890,1750 cw(c2846.09,1750) 2846.09,1706.09 1995.23,1706.09 1995.23,1769.08 cw(c1997.01,1769.08) 1997.01,1770.85 2498,1770.85 ccw(c2498,1792.45) 2519.6,1792.45 2519.6,1880.4 ccw(c2497,1880.4) 2497,1903 2409.05,1903 cw(c2409.04,1922.88) 2389.16,1922.88 2389.16,2034.38 ccw(c2368.56,2034.39) 2368.56,2054.99 2268.16,2054.99 cw(c2268.16,2086.63) 2236.52,2086.63 2236.52,2119.53 cw(c2263.99,2119.53) 2263.99,2147

## Other copper
Bottom Layer:
  rectangle net NEUTRAL: 2440.02,196.85 2491.98,576.62
  rectangle net NGND: 2151.68,2130.97 2193.65,2281.64
  rectangle net VC_INPUT: 2240.02,196.85 2291.98,576.62
  rectangle net VB_INPUT: 2039.37,196.85 2091.34,576.62
  rectangle net VA_INPUT: 1839.37,196.85 1891.34,576.62
  region net NGND: 2149.18,2255.96 ccw(c2135.16,2255.96) 2135.16,2269.99 2135.16,2328.84 2154.21,2328.84 cw(c2154.21,2269.99) 2213.06,2269.99 2210.18,2269.99 ccw(c2210.18,2253.46) 2193.65,2253.46 2191.15,2253.76 2191.15,2164.58 ccw(c2208.73,2164.58) 2208.73,2147 2208.73,2119.24 cw(c2202.66,2119.24) 2202.66,2113.17 2150.46,2113.17 cw(c2150.46,2130.97) 2132.66,2130.97 2132.66,2147 ccw(c2132.66,2163.52) 2149.18,2163.52
  pour cut-out: 2389.16,2012.52 2389.16,1985.31 2362.63,1985.31 2362.63,2012.52
  pour cut-out: 2772.64,1476.09 2795.09,1476.09 2795.09,2146.92 2772.64,2146.92
  pour cut-out: 1572.44,1476.09 1545.23,1476.09 1545.23,2146.92 1572.44,2146.92
  pour cut-out: 1550,1476.09 1550,1510 2795.09,1510 2795.09,1476.09

## Silkscreen, mask and mechanical layers (free items; w line width, h text height)
Top Overlay:
  drawing of 12 lines, arcs and shapes, not listed
  text "CAUTION" at 2049.88,620.13 h120
  text "HIGH VOLTAGE" at 1947.55,518.4 h120
  text "OFP_VIM_DC_v1.5" at 250.84,500 h55 r90
  text "L3" at 2209.85,303.91 h120
  text "L1" at 1814.85,302.47 h120
  text "L2" at 2010.85,302.47 h120
  text "N" at 2438.85,302.47 h120
Bottom Overlay:
  drawing of 2 lines, arcs and shapes, not listed
  text "CAUTION" at 3332.23,261.32 h120
  text "HIGH VOLTAGE" at 3434.56,159.59 h120
Board Outline:
  lines w5: 10.2,10.2 4320.51,10.2
  lines w7.5: 9.84,9.84 4320.87,9.84 4320.87,2549.21 9.84,2549.21 9.84,9.84
Fabrication:
  drawing of 191 lines, arcs and shapes, not listed
  text "Layer" at 5615.34,3070 h60
  text "Name" at 6025.26,3070 h60
  text "Material" at 6955,3070 h60
  text "Thickness" at 7814.77,3070 h60
  text "Constant" at 8464.6,3070 h60
  text "Board Layer Stack" at 9034.46,3070 h60
  text "Top Overlay" at 6025.26,2950 h60
  text "Top Solder" at 6025.26,2830 h60
  text "Solder Resist" at 6955,2830 h60
  text "0.010mm" at 7814.77,2830 h60
  text "3.5" at 8464.6,2830 h60
  text "1" at 5615.34,2710 h60
  text "Top Layer" at 6025.26,2710 h60
  text "0.035mm" at 7814.77,2710 h60
  text "Dielectric 1" at 6025.26,2590 h60
  text "FR-4" at 6955,2590 h60
  text "1.511mm" at 7814.77,2590 h60
  text "4.8" at 8464.6,2590 h60
  text "2" at 5615.34,2470 h60
  text "Bottom Layer" at 6025.26,2470 h60
  text "0.035mm" at 7814.77,2470 h60
  text "Bottom Solder" at 6025.26,2350 h60
  text "Solder Resist" at 6955,2350 h60
  text "0.010mm" at 7814.77,2350 h60
  text "3.5" at 8464.6,2350 h60
  text "Bottom Overlay" at 6025.26,2230 h60
  text "Total board thickness:" at 5615.34,2110 h60
  text "1.602mm" at 7814.77,2110 h60
Drill Drawing:
  circle w10: c210.62,4205.83 r20
  circle w10: c210.62,4205.83 r33.33
  lines w10: 177.29,4322.5 243.96,4322.5 243.96,4389.17 177.29,4389.17 177.29,4322.5 ; 177.29,4472.5 210.62,4489.17 243.96,4472.5 227.29,4505.83 243.96,4539.17 210.62,4522.5 177.29,4539.17 193.96,4505.83 177.29,4472.5 ; 177.29,4639.17 193.96,4639.17 210.62,4622.5 227.29,4639.17 243.96,4639.17 227.29,4655.83 243.96,4672.5 227.29,4672.5 210.62,4689.17 193.96,4672.5 177.29,4672.5 193.96,4655.83 177.29,4639.17
  lines w15: 117.5,4127.5 10848.51,4127.5 ; 117.5,4727.5 10848.51,4727.5 ; 668.38,3977.5 668.38,4877.5 ; 1258.22,3977.5 1258.22,4877.5 ; 2407.88,3977.5 2407.88,4877.5 ; 2913.76,3977.5 2913.76,4877.5 ; 3647.56,3977.5 3647.56,4877.5 ; 5147.11,3977.5 5147.11,4877.5 ; 5736.96,3977.5 5736.96,4877.5 ; 6482.76,3977.5 6482.76,4877.5 ; 7282.54,3977.5 7282.54,4877.5 ; 8136.3,3977.5 8136.3,4877.5 ; 9469.91,3977.5 9469.91,4877.5 ; 117.5,3977.5 10848.51,3977.5 10848.51,4877.5 117.5,4877.5 117.5,3977.5
  text "Symbol" at 207.5,4772.5 h72
  text "Count" at 713.38,4772.5 h72
  text "Hole Size" at 1303.22,4772.5 h72
  text "Plated" at 2452.88,4772.5 h72
  text "Hole Type" at 2958.76,4772.5 h72
  text "Drill Layer Pair" at 3692.56,4772.5 h72
  text "Via/Pad" at 5192.11,4772.5 h72
  text "Pad Shape" at 5781.96,4772.5 h72
  text "Template" at 6527.76,4772.5 h72
  text "Description" at 7327.54,4772.5 h72
  text "Hole Tolerance (+)" at 8181.3,4772.5 h72
  text "Hole Tolerance (-)" at 9514.91,4772.5 h72
  text "2" at 713.38,4622.5 h60
  text "137.79mil (3.500mm)" at 1303.22,4622.5 h60
  text "PTH" at 2452.88,4622.5 h60
  text "Round" at 2958.76,4622.5 h60
  text "Top Layer - Bottom Layer" at 3692.56,4622.5 h60
  text "Pad" at 5192.11,4622.5 h60
  text "Rounded" at 5781.96,4622.5 h60
  text "c450h350" at 6527.76,4622.5 h60
  text "6" at 713.38,4472.5 h60
  text "74.80mil (1.900mm)" at 1303.22,4472.5 h60
  text "PTH" at 2452.88,4472.5 h60
  text "Round" at 2958.76,4472.5 h60
  text "Top Layer - Bottom Layer" at 3692.56,4472.5 h60
  text "Pad" at 5192.11,4472.5 h60
  text "(Mixed)" at 5781.96,4472.5 h60
  text "(Mixed)" at 6527.76,4472.5 h60
  text "24" at 713.38,4322.5 h60
  text "40.16mil (1.020mm)" at 1303.22,4322.5 h60
  text "PTH" at 2452.88,4322.5 h60
  text "Round" at 2958.76,4322.5 h60
  text "Top Layer - Bottom Layer" at 3692.56,4322.5 h60
  text "Pad" at 5192.11,4322.5 h60
  text "Rounded" at 5781.96,4322.5 h60
  text "(Mixed)" at 6527.76,4322.5 h60
  text "117" at 713.38,4172.5 h60
  text "23.62mil (0.600mm)" at 1303.22,4172.5 h60
  text "PTH" at 2452.88,4172.5 h60
  text "Round" at 2958.76,4172.5 h60
  text "Top Layer - Bottom Layer" at 3692.56,4172.5 h60
  text "Via" at 5192.11,4172.5 h60
  text "Rounded" at 5781.96,4172.5 h60
  text "v120h60m0mx0" at 6527.76,4172.5 h60
  text "149 Total" at 713.38,4022.5 h60

## Dimensions
4320.87,2549.21 to 4320.51,10.2 on Dimension
9.84,2549.21 to 4320.87,2549.21 on Dimension